# Altium PCB NB2DSK01.PcbDoc (part 12 of 17)
Units mil, origin at the board's own origin, x right, y up, seen from the top; angles counter-clockwise.
Board outline 11815 x 6500.03 mil, 8 copper layers (Top Layer, MidLayer1, MidLayer2, GND, PWR, MidLayer3, MidLayer4, Bottom Layer), stack 74.62 mil thick; 798 components, 1002 nets, 3927 pads, 3182 vias.
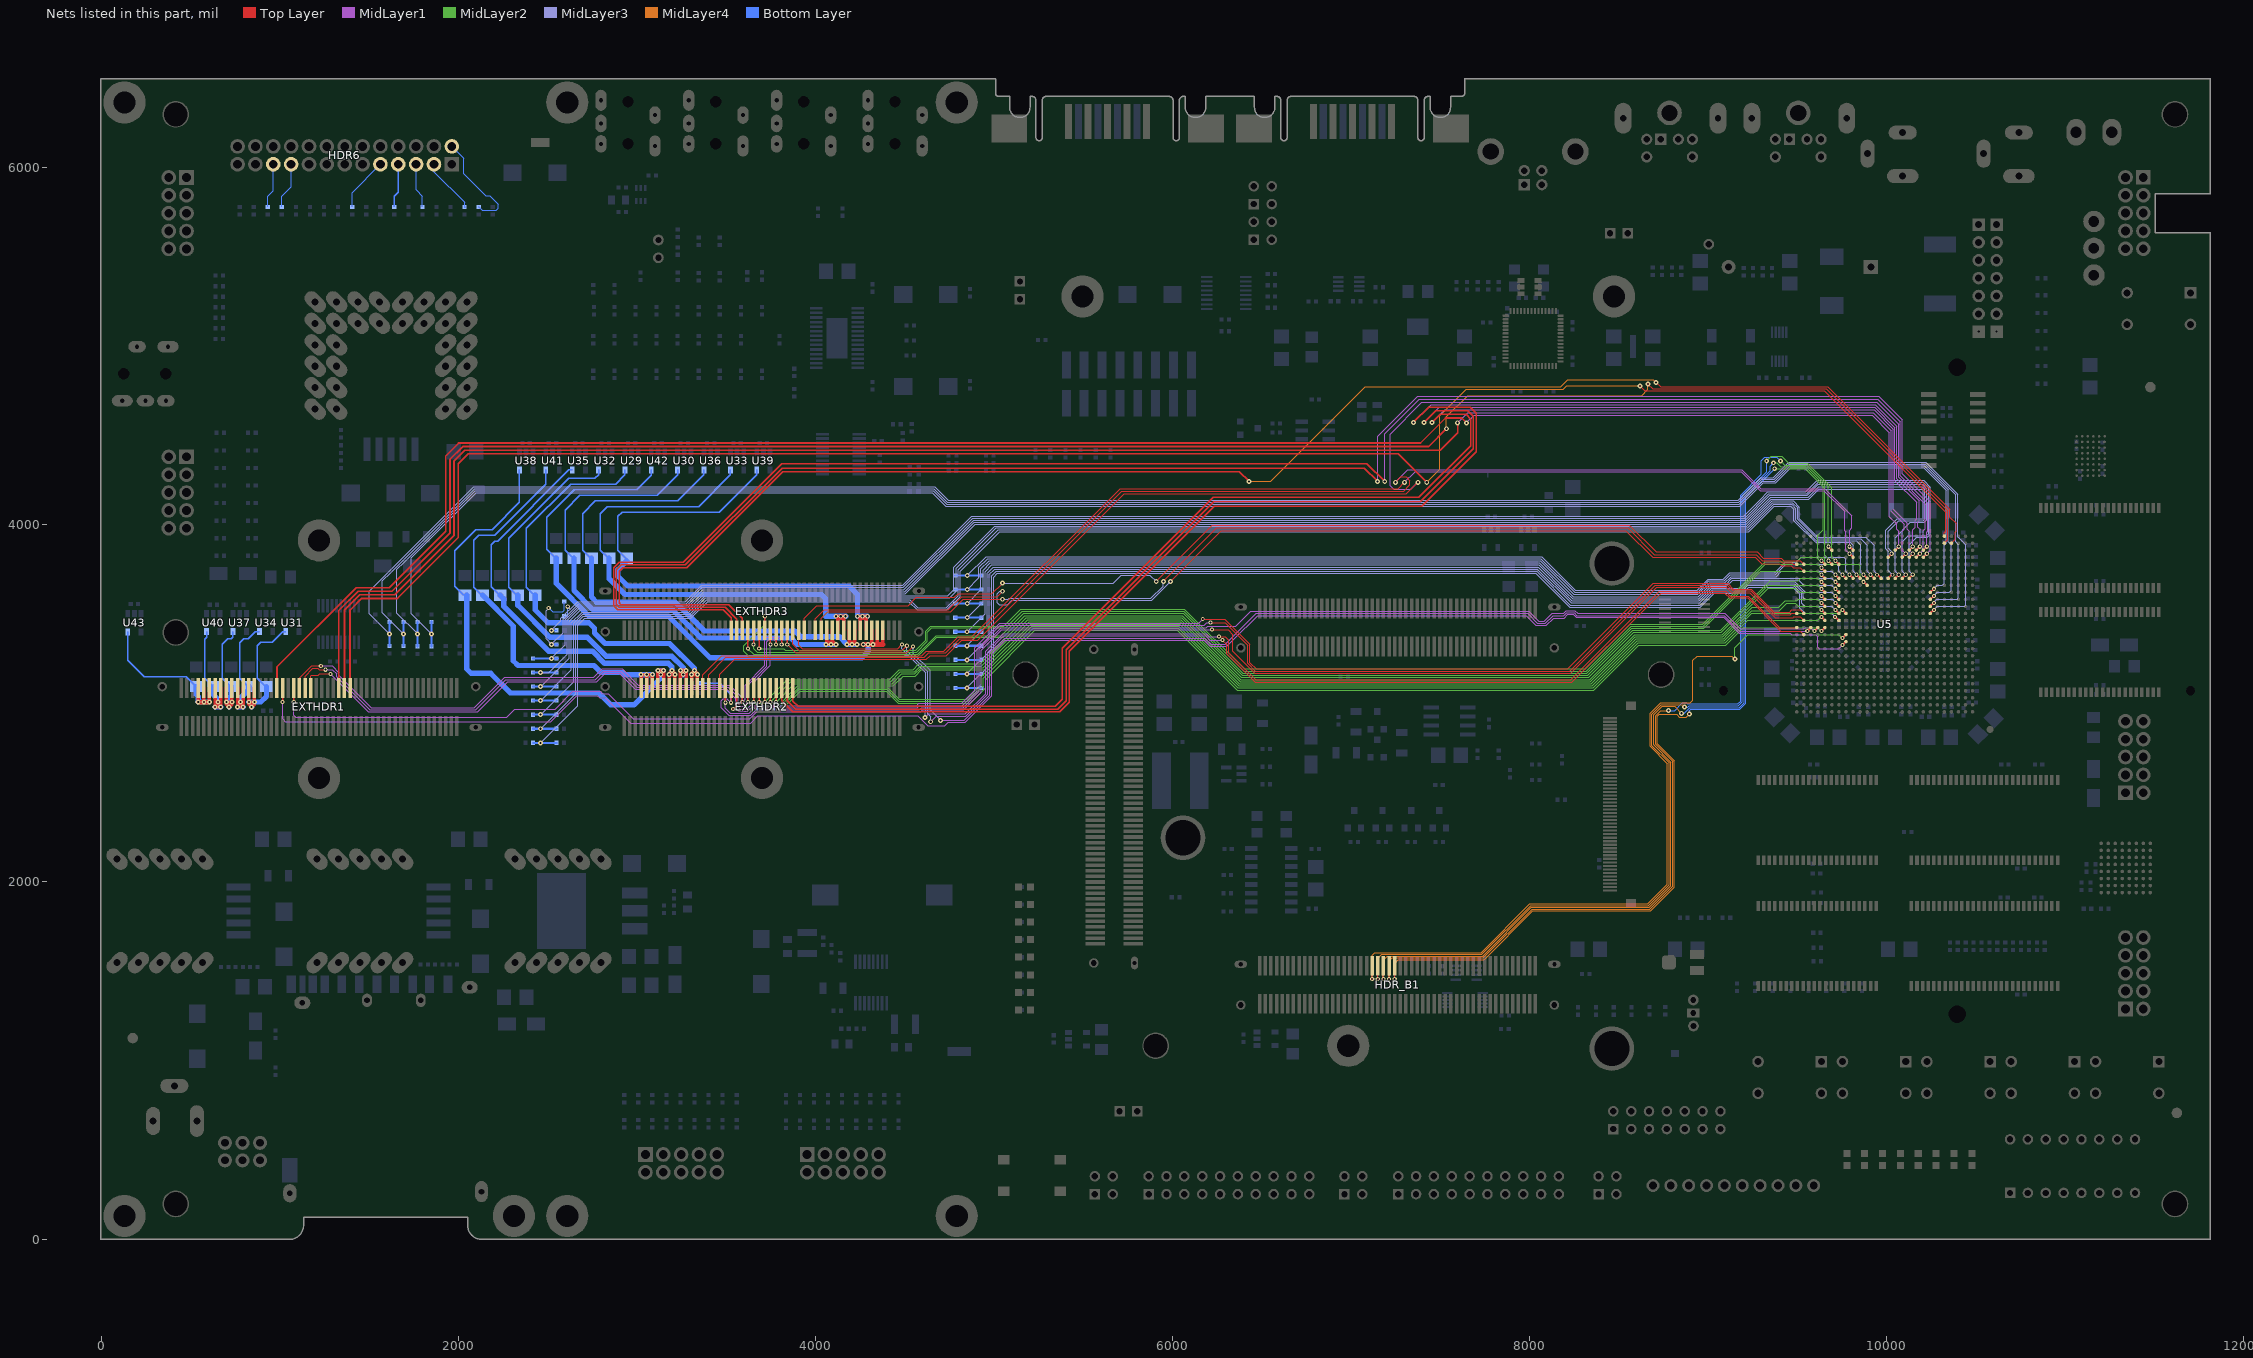
[diagram p18: the nets of this part, all layers, seen from the top]

## Via types
v1: diameter 23.62, hole 11.81, Top Layer to Bottom Layer, tented both sides, 1950 vias
v2: diameter 27.56, hole 11.81, Top Layer to Bottom Layer, tented both sides, 679 vias
v3: diameter 23.62, hole 11.81, Top Layer to Bottom Layer, 194 vias
v4: diameter 31.5, hole 11.81, Top Layer to Bottom Layer, tented both sides, 178 vias
v5: diameter 21.65, hole 11.81, Top Layer to Bottom Layer, tented both sides, 67 vias
v6: diameter 23.62, hole 11.81, Top Layer to Bottom Layer, tented bottom, 53 vias
v7: diameter 26, hole 11.81, Top Layer to Bottom Layer, tented both sides, 21 vias
v8: diameter 26, hole 11.81, Top Layer to Bottom Layer, 13 vias
v9: diameter 28, hole 11.81, Top Layer to Bottom Layer, 8 vias
v10: diameter 25.59, hole 11.81, Top Layer to Bottom Layer, tented both sides, 7 vias
v11: diameter 39.37, hole 11.81, Top Layer to Bottom Layer, tented both sides, 5 vias
v12: diameter 30, hole 11.81, Top Layer to Bottom Layer, 3 vias
v13: diameter 30, hole 11.81, Top Layer to Bottom Layer, tented both sides, 2 vias
v14: diameter 23, hole 11.81, Top Layer to Bottom Layer, tented both sides, 1 vias
v15: diameter 26.56, hole 11.81, Top Layer to Bottom Layer, tented both sides, 1 vias

## Nets (pads, with @x,y where several pads share a name; then routed paths per layer and width w, separated by ;. In a path a pad name is that pad's centre, name@x,y a point inside that pad or via, vN(x,y) a via of type N, cw(c..) or ccw(c..) an arc to the next point about the centre after c; other vN are vias at no path point) (continued)
PBCTRLA.JTAG.SOFT.TCK: R201.1 R205.1 U5.L20 | length 10456.2
  Top Layer w7.87: U5.L20@10244.09,3543.31 v1(10263.78,3562.99)
  MidLayer3 w5: v2(1692.91,3389.76) 1574.82,3507.86 1574.82,3685.85 1623.92,3734.95 2091.11,4202.14 4664,4202.14 4738.81,4127.34 9171.52,4127.34 9298.99,4254.8 9369.48,4254.8 9455.14,4340.45 10214.26,4340.45 10387,4167.72 10387,3904.34 10401.57,3889.76 10401.57,3590.55 10393.7,3582.68 10279.53,3582.68 v1(10263.78,3562.99)
  Bottom Layer w11.81: R205.1@1692.91,3322.36 R201.1@1692.91,3455.2
PBCTRLA.JTAG.SOFT.TDI: R198.1 R202.1 U5.J20 | length 10156.7
  Top Layer w7.87: U5.J20@10244.09,3622.05 v1(10264.57,3641.73)
  MidLayer3 w5: v2(1850.39,3387.8) 1736.75,3501.44 1736.75,3816.29 2100.33,4179.87 4654.78,4179.87 4729.58,4105.06 9177.53,4105.06 9307.27,4234.8 9377.77,4234.8 9463.42,4320.45 10205.98,4320.45 10333,4193.43 10333,3895.99 10322.83,3885.83 10322.83,3673.23 10311.02,3661.42 10283.47,3661.42 v1(10264.57,3641.73)
  Bottom Layer w11.81: R202.1@1850.39,3320.39 R198.1@1850.39,3455.2 R198.1@1850.39,3457.48
PBCTRLA.JTAG.SOFT.TDO: R199.1 R203.1 U5.K20 | length 10299.5
  Top Layer w7.87: U5.K20@10244.09,3582.68 v1(10264.57,3602.36)
  MidLayer3 w5: v2(1771.65,3389.76) 1655.59,3505.83 1655.59,3750.87 1699.07,3794.35 2095.72,4191 4659.39,4191 4734.19,4116.2 9174.53,4116.2 9303.13,4244.8 9373.63,4244.8 9459.28,4330.45 10210.12,4330.45 10343,4197.57 10343,3905.03 10362.2,3885.83 10362.2,3633.86 10350.39,3622.05 10283.47,3622.05 v1(10264.57,3602.36)
  Bottom Layer w11.81: R203.1@1771.65,3320.39 R199.1@1771.65,3455.2
PBCTRLA.JTAG.SOFT.TMS: R200.1 R204.1 U5.M20 | length 10602.6
  Top Layer w7.87: U5.M20@10244.09,3503.94 v1(10263.78,3523.62)
  MidLayer3 w5: v2(1614.17,3389.76) 1502.32,3501.62 1502.32,3628.06 1566.5,3692.24 2087.54,4213.27 4668.62,4213.27 4743.42,4138.47 9168.52,4138.47 9294.84,4264.8 9365.34,4264.8 9451,4350.45 10218.4,4350.45 10397,4171.86 10397,3933.71 10440.95,3889.76 10440.95,3551.18 10433.07,3543.31 10283.47,3543.31 v1(10263.78,3523.62)
  Bottom Layer w11.81: R204.1@1614.17,3322.36 R200.1@1614.17,3455.2
PBCTRLA.SPARE1: EXTHDR1.39 U5.A22 | length 10874.3
  Top Layer w5: v2(8617.38,4778.45) 8643.55,4752.28 9649.85,4752.28 9706.17,4695.97 10330.71,4071.43 10330.71,3964.57 10322.84,3956.69 U5.A22@10322.83,3937.01
  Top Layer w10: EXTHDR1.39@1393.7,3086.61 1393.7,3523.47 1458.68,3588.45 1659.32,3588.45 2000,3929.13 2000,4342.52 2055.93,4398.45 7263.68,4398.45 v2(7423.68,4238.45)
  MidLayer4 w5: v2(7423.68,4238.45) 7496.06,4310.84 7496.06,4610.24 7644.28,4758.45 8188.68,4758.45 8208.68,4778.45 v2(8617.38,4778.45)
PBCTRLA.SPARE2: EXTHDR1.41 U5.D16 | length 10635
  Top Layer w7.87: U5.D16@10086.61,3818.9 v1(10106.3,3838.58)
  Top Layer w10: EXTHDR1.41@1362.2,3086.61 1362.2,3521.98 1448.68,3608.45 1643.89,3608.45 1976.38,3940.94 1976.38,4358.27 2036.56,4418.45 7498.68,4418.45 7596.97,4516.74 v2(7596.97,4571.74)
  MidLayer1 w5: v2(7596.97,4571.74) 7653.68,4628.45 9923.68,4628.45 10025.33,4526.81 10025.33,4076.81 10098.43,4003.71 10098.43,3976.38 10086.62,3964.57 10086.62,3858.27 v1(10106.3,3838.58)
PBCTRLA.SPARE3: EXTHDR1.43 U5.B22 | length 10753.1
  Top Layer w5: v2(8662.38,4788.45) 8688.55,4762.28 9659.85,4762.28 9713.54,4708.59 10342.52,4079.61 10342.52,3917.32 U5.B22@10322.83,3897.64
  Top Layer w10: EXTHDR1.43@1330.71,3086.61 1330.71,3520.48 1438.68,3628.45 1628.45,3628.45 1952.76,3952.76 1952.76,4366.14 2025.07,4438.45 7433.68,4438.45 v2(7533.68,4538.45)
  MidLayer4 w5: v2(7533.68,4538.45) 7533.68,4604.55 7652.59,4723.45 8627.38,4723.45 8662.38,4758.45 v2(8662.38,4788.45)
PBCTRLA.SPARE4: EXTHDR1.65 U5.C15 | length 10729.9
  Top Layer w7.87: U5.C15@10047.24,3858.27 v1(10066.93,3877.95)
  Top Layer w10: EXTHDR1.65@984.25,3086.61 984.25,3204.02 1428.68,3648.45 1613.02,3648.45 1929.13,3964.57 1929.13,4385.83 2001.76,4458.45 7388.68,4458.45 7528.68,4598.45 7618.78,4598.45 v2(7646.23,4571)
  MidLayer1 w5: v2(7646.23,4571) 7688.68,4613.45 9918.68,4613.45 10015.27,4516.86 10015.27,4046.86 10055.12,4007.02 10055.12,3976.38 10066.93,3964.57 v1(10066.93,3877.95)
PBCTRLA.SPI_CS_N0: EXTHDR1.59 U5.N2 | length 9521.4
  Top Layer w5: v5(6220.47,3413.39) 6311.02,3413.39 6338.58,3385.83 6338.58,3291.34 6460.63,3169.29 8230.52,3169.29 8712.68,3651.45 9102.25,3651.45 9132.92,3620.79 9233.93,3620.79 9374.4,3480.32 9413.39,3480.32 9433.07,3480.32 9476.38,3480.32 9480.32,3484.25 9515.75,3484.25 U5.N2@9535.43,3464.57
  Top Layer w7.87: v1(1078.74,3007.87) EXTHDR1.59@1078.74,3086.61
  MidLayer1 w5: v1(1078.74,3007.87) 1078.74,2933.07 1090.55,2921.26 2270.37,2921.26 2315.54,2966.43 2541.65,2966.43 2642.16,3066.93 2795.28,3066.93 2807.09,3055.12 2838.58,3055.12 2980.32,2913.39 3632.25,2913.39 3671.62,2952.76 4590.55,2952.76 4602.36,2964.57 4830.71,2964.57 4929.13,3062.99 4929.13,3299.21 5043.31,3413.39 v5(6220.47,3413.39)
PBCTRLA.SPI_CS_N1: EXTHDR1.63 U5.T8 | length 9702.4
  Top Layer w7.87: v1(1015.75,3007.87) EXTHDR1.63@1015.75,3086.61 ; v1(9751.97,3326.77) U5.T8@9771.65,3346.46
  MidLayer1 w5: v1(1015.75,3007.87) 1015.75,2913.39 1031.5,2897.64 2516.59,2897.64 2662.26,3043.31 2779.53,3043.31 2791.34,3031.5 2822.83,3031.5 2964.57,2889.76 3636.91,2889.76 3678.1,2930.95 4572.99,2930.95 4629.92,2874.02 4724.41,2874.02 4744.09,2893.7 4838.58,2893.7 4988.19,3043.31 4988.19,3279.53 5062.99,3354.33 6177.17,3354.33 6212.6,3318.9 6303.15,3318.9 6342.52,3358.27 6476.39,3492.13 7980.31,3492.13 8035.43,3437.01 8092.46,3437.01 8133.91,3478.45 8193.68,3478.45 8213.68,3498.45 8243.68,3498.45 8260.01,3482.13 9085.68,3482.13 9174.11,3393.7 9413.39,3393.7 9433.07,3393.7 9460.63,3393.7 9468.5,3385.83 9602.36,3385.83 9614.17,3374.02 9614.17,3314.96 9622.05,3307.09 9732.28,3307.09 v1(9751.97,3326.77)
PBCTRLB.1W.ID: EXTHDR2.61 R143.1 U5.P4 | length 7088.1
  Top Layer w7.87: v1(3527.56,3004.42) EXTHDR2.61@3527.56,3086.61 ; v1(9594.49,3405.51) U5.P4@9614.17,3425.2
  MidLayer1 w5: v1(3527.56,3004.42) 3504.42,3027.56 3484.25,3027.56 3472.44,3015.75 3472.44,2976.38 3515.75,2933.07 3637.8,2933.07 3669.29,2964.57 4582.68,2964.57 4594.49,2976.38 4826.77,2976.38 4917.32,3066.93 4917.32,3303.15 5039.37,3425.2 6188.98,3425.2 6196.85,3433.07 6354.33,3433.07 6437.01,3515.75 7996.06,3515.75 8051.18,3460.63 8082.68,3460.63 8125.98,3503.94 8190.02,3503.94 8204.54,3518.45 8253.68,3518.45 8268.2,3503.94 9092.16,3503.94 9178.77,3417.32 9413.39,3417.32 9433.07,3417.32 9535.43,3417.32 9543.31,3425.2 9574.8,3425.2 v1(9594.49,3405.51)
  Bottom Layer w10: R143.1@3349.86,3113.45 3463.68,3113.45 3527.56,3049.58 v1(3527.56,3004.42)
PBCTRLB.1W.PIO1: EXTHDR2.69 U5.C9 | length 7463.6
  Top Layer w5: EXTHDR2.69@3401.57,3086.61 3401.57,3161.35 3498.68,3258.45 4608.68,3258.45 4633.68,3283.45 4728.68,3283.45 4808.68,3363.45 4890.68,3363.45 5715.68,4188.45 7293.68,4188.45 7328.68,4223.45 7328.68,4248.45 7308.68,4268.45 7278.68,4268.45 v2(7248.68,4238.45)
  Top Layer w7.87: v1(9791.34,3877.95) U5.C9@9811.02,3858.27
  MidLayer1 w5: v2(7248.68,4238.45) 7318.68,4308.45 9188.68,4308.45 9295.14,4202 9651.85,4202 9803.68,4050.17 9803.68,3983.45 9791.34,3971.11 v1(9791.34,3877.95)
PBCTRLB.1W.PIO2: EXTHDR2.71 U5.D9 | length 7308.5
  Top Layer w5: EXTHDR2.71@3370.08,3086.61 3370.08,3161.85 3476.68,3268.45 4596.68,3268.45 4621.68,3293.45 4718.68,3293.45 4798.68,3373.45 4876.68,3373.45 5706.68,4203.45 7263.68,4203.45 v2(7298.68,4238.45)
  Top Layer w7.87: v1(9791.34,3838.58) U5.D9@9811.02,3818.9
  MidLayer1 w5: v2(7298.68,4238.45) 7358.68,4298.45 9184.05,4298.45 9290.51,4192 9647.71,4192 9763.68,4076.03 9763.68,3968.45 9771.65,3960.48 9771.65,3858.27 v1(9791.34,3838.58)
PBCTRLB.CLK.CLK0: EXTHDR2.51 U5.M5 | length 6593.4
  Top Layer w7.87: v1(3685.04,3007.87) EXTHDR2.51@3685.04,3086.61 ; v1(9633.86,3523.62) U5.M5@9653.54,3503.94
  MidLayer2 w5: v1(3685.04,3007.87) 3704.72,2988.19 3791.34,2988.19 3901.58,3098.43 4437.01,3098.43 4492.13,3153.54 4559.78,3153.54 4594.09,3187.85 4947.7,3187.85 5204.72,3444.88 6039.37,3444.88 6374.02,3110.24 8345.27,3110.24 8597.24,3362.21 9086.61,3362.21 9108,3383.59 9244.86,3520.45 9398.41,3520.45 9438.86,3560.91 9486.34,3560.91 9503.94,3543.31 9614.17,3543.31 v1(9633.86,3523.62)
PBCTRLB.CLK.CLK1: EXTHDR2.45 U5.L5 | length 6484.4
  Top Layer w7.87: v1(3779.53,3007.87) EXTHDR2.45@3779.53,3086.61 ; v1(9633.86,3562.99) U5.L5@9653.54,3543.31
  MidLayer2 w5: v1(3779.53,3007.87) 3881.89,3110.24 4429.13,3110.24 4484.25,3165.36 4557.45,3165.36 4591.55,3199.45 4939.61,3199.45 5196.85,3456.69 6043.31,3456.69 6377.95,3122.05 8340.38,3122.05 8592.35,3374.02 9082.68,3374.02 9246.12,3537.45 9394.68,3537.45 9431.68,3574.45 9495.71,3574.45 9503.94,3582.68 9614.17,3582.68 v1(9633.86,3562.99)
PBCTRLB.CLK.CLK2: EXTHDR2.47 U5.K5 | length 6553.4
  Top Layer w7.87: v1(3748.03,3007.87) EXTHDR2.47@3748.03,3086.61 ; v1(9633.86,3602.36) U5.K5@9653.54,3582.68
  MidLayer2 w5: v1@3745.7,3007.87 v1@3746.87,3009.04 ; v1(3748.03,3007.87) 3862.21,3122.05 4421.26,3122.05 4476.38,3177.17 4555.12,3177.17 4587.41,3209.45 4929.93,3209.45 5188.98,3468.5 6047.24,3468.5 6381.89,3133.86 8335.49,3133.86 8587.45,3385.83 9077.78,3385.83 9337.63,3645.67 9417.32,3645.67 9433.07,3645.67 9488.19,3645.67 9511.81,3622.05 9614.17,3622.05 v1(9633.86,3602.36)
PBCTRLB.CLK.EN: EXTHDR2.49 U5.J5 | length 6580
  Top Layer w7.87: v1(3716.54,3007.87) EXTHDR2.49@3716.54,3086.61 ; v1(9633.86,3641.73) U5.J5@9653.54,3622.05
  MidLayer2 w5: v1(3716.54,3007.87) 3842.52,3133.86 4413.39,3133.86 4468.5,3188.98 4547.24,3188.98 4579.72,3221.45 4922.24,3221.45 5181.1,3480.32 6051.18,3480.32 6385.83,3145.67 8330.59,3145.67 8582.56,3397.64 9072.89,3397.64 9336.67,3661.42 9417.32,3661.42 9433.07,3661.42 9614.17,3661.42 v1(9633.86,3641.73)
PBCTRLB.JTAG.DETECT: R224.1 R225.1 U5.G9 | length 5394.3
  Top Layer w7.87: v1(9791.34,3720.47) U5.G9@9811.02,3700.79
  MidLayer3 w5: v2(4850.39,3716.54) 4956.69,3822.84 8066.93,3822.84 8255.91,3633.86 8938,3633.86 8999.99,3695.85 9084.86,3695.85 9119.8,3730.79 9372.34,3730.79 9431.08,3789.53 9490.32,3789.53 9519.69,3818.9 9759.84,3818.9 9771.65,3807.09 9771.65,3740.16 v1(9791.34,3720.47)
  Bottom Layer w11.81: R225.1@4782.99,3716.54 R224.1@4929.61,3716.54
PBCTRLB.JTAG.HARD.TCK: R211.1 R215.1 U5.L7 | length 5637.9
  Top Layer w7.87: v1(9712.6,3562.99) U5.L7@9732.28,3543.31
  MidLayer3 w5: v2(4848.43,3244.1) 4974.41,3370.08 4974.41,3722.44 5003.94,3751.97 8043.31,3751.97 8232.28,3562.99 8951.99,3562.99 9024.85,3635.85 9181.18,3635.85 9216.12,3670.79 9481.77,3670.79 9532.83,3619.73 9532.83,3593.16 9543.31,3582.68 9696.85,3582.68 v1(9712.6,3562.99)
  Bottom Layer w11.81: R215.1@4784.96,3244.1 R211.1@4929.61,3244.1
PBCTRLB.JTAG.HARD.TDI: R208.1 R212.1 U5.M7 | length 5727.6
  Top Layer w7.87: v1(9712.6,3523.62) U5.M7@9732.28,3503.94
  MidLayer3 w5: v2(4848.43,3165.36) 4986.22,3303.15 4986.22,3714.57 5011.81,3740.16 8039.37,3740.16 8228.35,3551.18 8954.32,3551.18 9028.99,3625.85 9187.89,3625.85 9222.83,3660.79 9477.63,3660.79 9522.83,3615.58 9522.83,3561.98 9541.5,3543.31 9692.91,3543.31 v1(9712.6,3523.62)
  Bottom Layer w11.81: R212.1@4784.96,3165.35 R208.1@4929.61,3165.35
PBCTRLB.JTAG.HARD.TDO: R209.1 R213.1 U5.N7 | length 5816.6
  Top Layer w7.87: v5@9709.84,3485.83 9710.84,3484.89 U5.N7@9732.28,3464.57
  MidLayer3 w5: v2(4848.43,3086.61) 4998.03,3236.22 4998.03,3706.69 5019.69,3728.35 8035.43,3728.35 8224.41,3539.37 8956.65,3539.37 9033.13,3615.85 9192.03,3615.85 9226.97,3650.79 9473.48,3650.79 9512.83,3611.44 9512.83,3534.41 9543.3,3503.94 9558.84,3503.94 9692.91,3503.94 v5@9709.84,3485.83
  Bottom Layer w11.81: R213.1@4784.96,3086.61 R209.1@4929.61,3086.61
  other v5: 9710.24,3484.25
PBCTRLB.JTAG.HARD.TMS: R210.1 R214.1 U5.K7 | length 5545.8
  Top Layer w7.87: v1(9712.6,3602.36) U5.K7@9732.28,3582.68
  MidLayer3 w5: v2(4848.43,3322.84) 4962.6,3437.01 4962.6,3730.32 4996.06,3763.78 8047.24,3763.78 8236.22,3574.8 8949.66,3574.8 9020.7,3645.85 9174.48,3645.85 9209.42,3680.79 9485.91,3680.79 9544.65,3622.05 9692.91,3622.05 v1(9712.6,3602.36)
  Bottom Layer w11.81: R214.1@4784.96,3322.84 R210.1@4929.61,3322.84
PBCTRLB.JTAG.SOFT.TCK: R219.1 R223.1 U5.G7 | length 5345.6
  Top Layer w7.87: v1(9712.6,3720.47) U5.G7@9732.28,3700.79
  MidLayer3 w5: v2(4850.39,3559.06) 4927.17,3635.83 4927.17,3753.94 4972.44,3799.21 8059.06,3799.21 8219.18,3639.09 8248.03,3610.24 8942.66,3610.24 9008.28,3675.85 9093.78,3675.85 9128.72,3710.79 9380.63,3710.79 9410,3740.16 9692.91,3740.16 v1(9712.6,3720.47)
  Bottom Layer w11.81: R223.1@4782.99,3559.06 R219.1@4929.61,3559.06
PBCTRLB.JTAG.SOFT.TDI: R216.1 R220.1 U5.J7 | length 5471.7
  Top Layer w7.87: v1(9712.6,3641.73) U5.J7@9732.28,3622.05
  MidLayer3 w5: v2@4850.39,3401.58 4950.79,3501.97 4950.79,3738.19 4988.19,3775.59 8051.18,3775.59 8206.07,3620.7 8240.16,3586.61 8947.32,3586.61 9016.56,3655.85 9102.06,3655.85 9137,3690.79 9506.07,3690.79 9535.43,3661.42 9692.91,3661.42 v1(9712.6,3641.73)
  Bottom Layer w11.81: R220.1@4782.99,3401.58 R216.1@4929.61,3401.58
  other v2: 4848.43,3401.58
PBCTRLB.JTAG.SOFT.TDO: R217.1 R221.1 U5.H7 | length 5396.5
  Top Layer w7.87: v1(9712.6,3681.1) U5.H7@9732.28,3661.42
  MidLayer3 w5: v2(4850.39,3480.32) 4938.98,3568.9 4938.98,3746.06 4980.32,3787.4 8055.12,3787.4 8244.09,3598.43 8944.99,3598.43 9012.42,3665.85 9097.92,3665.85 9132.86,3700.79 9433.07,3700.79 9692.91,3700.79 v1(9712.6,3681.1)
  Bottom Layer w11.81: R221.1@4782.99,3480.32 R217.1@4929.61,3480.32
PBCTRLB.JTAG.SOFT.TMS: R218.1 R222.1 U5.G8 | length 5366.5
  Top Layer w7.87: v1(9751.97,3720.47) U5.G8@9771.65,3700.79
  MidLayer3 w5: v2(4850.39,3637.8) 4915.35,3702.76 4915.35,3761.81 4964.57,3811.02 8062.99,3811.02 8251.97,3622.05 8940.33,3622.05 9004.13,3685.85 9089,3685.85 9123.94,3720.79 9376.49,3720.79 9435.23,3779.53 9720.47,3779.53 9732.28,3767.72 9732.28,3740.16 v1(9751.97,3720.47)
  Bottom Layer w11.81: R222.1@4782.99,3637.8 R218.1@4929.61,3637.8
PBCTRLB.SPARE1: EXTHDR2.39 U5.D17 | length 8472.6
  Top Layer w7.87: U5.D17@10125.98,3818.9 v1(10145.67,3838.58)
  Top Layer w8: EXTHDR2.39@3874.02,3086.61 3874.02,3013.12 3903.68,2983.45 5342.68,2983.45 5383.68,3024.45 5383.68,3308.45 6228.68,4153.45 7378.68,4153.45 7669.29,4444.06 7669.29,4592.84 7643.68,4618.45 7498.68,4618.45 v2(7453.68,4573.45)
  MidLayer1 w5: v2(7453.68,4573.45) 7523.68,4643.45 9928.68,4643.45 10035.74,4536.39 10035.74,4086.39 10114.17,4007.96 10114.17,3976.38 10125.99,3964.57 10125.99,3858.27 v1(10145.67,3838.58)
PBCTRLB.SPARE2: EXTHDR2.41 U5.C17 | length 8674.6
  Top Layer w7.87: U5.C17@10125.98,3858.27 v1(10145.67,3877.95)
  Top Layer w8: EXTHDR2.41@3842.52,3086.61 3842.52,3014.61 3888.68,2968.45 5356.68,2968.45 5403.68,3015.45 5403.68,3300.45 6231.68,4128.45 7386.68,4128.45 7685.04,4426.81 7685.04,4607.1 7653.68,4638.45 7473.68,4638.45 v2(7408.68,4573.45)
  MidLayer1 w5: v2(7408.68,4573.45) 7493.68,4658.45 9931.68,4658.45 10045.74,4544.39 10045.74,4247.39 10167.68,4125.45 10167.68,4033.45 10159.68,4025.45 10159.68,3986.45 10145.67,3972.44 v1(10145.67,3877.95)
PBCTRLB.SPARE3: EXTHDR2.43 U5.C18 | length 8936.3
  Top Layer w7.87: U5.C18@10165.35,3858.27 v1(10185.04,3877.95)
  Top Layer w8: EXTHDR2.43@3811.02,3086.61 3811.02,3016.11 3873.68,2953.45 5369.68,2953.45 5421.68,3005.45 5421.68,3291.45 6233.68,4103.45 7395.68,4103.45 7700.79,4408.56 7700.79,4626.35 7668.68,4658.45 7433.68,4658.45 v2(7348.68,4573.45)
  MidLayer1 w5: v2(7348.68,4573.45) 7447.68,4672.45 9936.68,4672.45 10055.74,4553.39 10055.74,4259.39 10180.68,4134.45 10180.68,4022.45 10174.68,4016.45 10174.68,3987.45 10187.68,3974.45 10187.68,3880.6 v1(10185.04,3877.95)
PBCTRLB.SPARE4: EXTHDR2.65 U5.D18 | length 8699.6
  Top Layer w5: EXTHDR2.65@3464.57,3086.61 3464.57,3162.34 3548.68,3246.45 4621.68,3246.45 4643.68,3268.45 4733.68,3268.45 4818.68,3353.45 4908.68,3353.45 5728.68,4173.45 7308.68,4173.45 v2(7373.68,4238.45)
  Top Layer w7.87: U5.D18@10165.35,3818.9 v1(10185.04,3838.58)
  MidLayer1 w5: v2(7373.68,4238.45) 7333.68,4198.45 7238.68,4198.45 7218.68,4218.45 7218.68,4508.45 7396.68,4686.45 9942.68,4686.45 10065.74,4563.39 10065.74,4265.39 10215.68,4115.45 10215.68,3977.45 10204.68,3966.45 10204.68,3858.23 v1(10185.04,3838.58)
PBCTRLB.SPI_CS_N0: EXTHDR2.59 U5.M2 | length 6934
  Top Layer w5: v5(6169.29,3472.44) 6291.34,3472.44 6433.07,3330.71 6433.07,3228.35 6468.5,3192.91 8212.48,3192.91 8693.02,3673.45 9108.53,3673.45 9141.2,3640.79 9242.21,3640.79 9371.19,3511.81 9456.69,3511.81 9468.5,3523.62 9515.75,3523.62 U5.M2@9535.43,3503.94
  Top Layer w7.87: v1(3539.37,2968.5) 3559.06,2988.19 EXTHDR2.59@3559.06,3086.61
  MidLayer1 w5: v1(3539.37,2968.5) 3559.06,2968.5 3570.87,2956.69 3622.05,2956.69 3653.54,2988.19 4566.93,2988.19 4578.74,3000 4818.9,3000 4893.7,3074.8 4893.7,3311.02 5031.5,3448.82 6145.67,3448.82 v5(6169.29,3472.44)
PBCTRLB.SPI_CS_N1: EXTHDR2.63 U5.M1 | length 6918.4
  Top Layer w5: v5(6212.6,3452.76) 6295.28,3452.76 6421.26,3326.77 6421.26,3224.41 6464.57,3181.1 8223.33,3181.1 8704.68,3662.45 9105.39,3662.45 9137.06,3630.79 9238.07,3630.79 9372.79,3496.06 9413.39,3496.06 9433.07,3496.06 9460.63,3496.06 9468.5,3503.94 U5.M1@9496.06,3503.94
  Top Layer w7.87: v1(3496.06,3004.42) EXTHDR2.63@3496.06,3086.61
  MidLayer1 w5: v1(3496.06,3004.42) 3496.06,2972.44 3523.62,2944.88 3629.92,2944.88 3661.42,2976.38 4570.87,2976.38 4582.68,2988.19 4822.83,2988.19 4905.51,3070.87 4905.51,3307.09 5035.43,3437.01 6177.17,3437.01 6192.91,3452.76 v5(6212.6,3452.76)
PBCTRLC.1W.ID: EXTHDR3.61 R144.1 U5.R2 | length 6959.3
  Top Layer w5: EXTHDR3.61@3874.02,3388.45 3874.02,3330.71 ; 3896.43,3308.29 3874.02,3330.71 ; v1(4511.81,3322.84) 4484.25,3295.28 3909.45,3295.28 3874.02,3330.71 ; v5(6279.53,3354.33) 6303.15,3330.71 6303.15,3279.53 6463.22,3119.45 8236.68,3119.45 8716.67,3599.44 8735.68,3618.45 9092.82,3618.45 9120.49,3590.79 9221.5,3590.79 9406.78,3405.51 9515.75,3405.51 U5.R2@9535.43,3385.83
  MidLayer1 w5: v2(4645.67,2897.64) 4677.17,2929.13 4842.52,2929.13 4964.57,3051.18 4964.57,3287.4 5055.12,3377.95 6185.04,3377.95 6208.66,3354.33 v5(6279.53,3354.33)
  MidLayer3 w5: v1(4511.81,3322.84) 4511.81,3295.28 4629.92,3177.17 4629.92,2940.95 4645.67,2925.2 v2(4645.67,2897.64)
  Bottom Layer w5: R144.1@4511.81,3264.66 v1(4511.81,3322.84)
PBCTRLC.1W.PIO1: EXTHDR3.69 U5.F2 | length 6051.2
  Top Layer w5: EXTHDR3.69@4000,3409.45 4000,3474.77 4048.68,3523.45 4743.68,3523.45 4818.68,3598.45 5018.68,3598.45 v2(5048.68,3628.45) ; v2(5988.68,3683.45) 6273.68,3968.45 8538.68,3968.45 8688.68,3818.45 9263.68,3818.45 9298.68,3783.45 9398.68,3783.45 9410.48,3771.65 9464.57,3771.65 9476.38,3759.84 9515.75,3759.84 U5.F2@9535.43,3740.16
  MidLayer3 w5: v2(5048.68,3628.45) 5033.68,3628.45 5018.68,3613.45 5018.68,3563.45 5028.68,3553.45 5076,3553.45 5100.55,3578 5883.23,3578 v2(5988.68,3683.45)
PBCTRLC.1W.PIO2: EXTHDR3.71 U5.E1 | length 5841.1
  Top Layer w5: EXTHDR3.71@4031.5,3409.45 4031.5,3476.27 4068.68,3513.45 4758.68,3513.45 4828.68,3583.45 v2(5048.68,3583.45) ; v2(5948.68,3683.45) 6248.68,3983.45 8548.68,3983.45 8698.68,3833.45 9268.68,3833.45 9303.68,3798.45 9403.68,3798.45 9414.73,3787.4 9468.5,3787.4 9476.38,3779.53 U5.E1@9496.06,3779.53
  MidLayer3 w5: v2(5048.68,3583.45) 5080.45,3583.45 5085,3588 5879.09,3588 5948.68,3657.6 v2(5948.68,3683.45)
PBCTRLC.CLK.CLK0: EXTHDR3.51 U5.H5 | length 6865.6
  Top Layer w7.87: EXTHDR3.51@3716.54,3409.45 v1(3716.54,3488.19) ; v1(9633.86,3681.1) U5.H5@9653.54,3661.42
  MidLayer2 w5: v1(3716.54,3488.19) 3716.54,3440.95 3598.43,3322.84 3598.43,3291.34 3625.98,3263.78 4574.2,3263.78 4680.42,3370 5051.1,3370 5173.23,3492.13 6055.12,3492.13 6389.76,3157.48 8325.7,3157.48 8577.67,3409.45 9070.56,3409.45 9347.57,3686.45 9503.05,3686.45 9517.39,3700.79 9614.17,3700.79 v1(9633.86,3681.1)
PBCTRLC.CLK.CLK1: EXTHDR3.45 U5.G5 | length 6632.9
  Top Layer w7.87: v1(3622.05,3307.09) EXTHDR3.45@3622.05,3409.45 ; v1(9633.86,3720.47) U5.G5@9653.54,3700.79
  MidLayer2 w5: v1(3622.05,3307.09) 3653.54,3275.59 4571.87,3275.59 4676.28,3380 5041.42,3380 5165.35,3503.94 6059.06,3503.94 6393.7,3169.29 8320.81,3169.29 8572.78,3421.26 8974.49,3421.26 9293.39,3740.16 9614.17,3740.16 v1(9633.86,3720.47)
PBCTRLC.CLK.CLK2: EXTHDR3.47 U5.F5 | length 6637.7
  Top Layer w7.87: v1(3653.54,3330.71) EXTHDR3.47@3653.54,3409.45 ; v1(9633.86,3759.84) U5.F5@9653.54,3740.16
  MidLayer2 w5: v1(3653.54,3330.71) 3653.54,3307.09 3673.23,3287.4 4566.63,3287.4 4627.68,3348.45 4627.68,3399.31 4651.37,3423 5064.73,3423 5157.48,3515.75 6062.99,3515.75 6397.64,3181.1 8315.92,3181.1 8567.88,3433.07 8972.16,3433.07 9318.61,3779.53 9417.32,3779.53 9433.07,3779.53 9614.17,3779.53 v1(9633.86,3759.84)
PBCTRLC.CLK.EN: EXTHDR3.49 U5.E5 | length 6612
  Top Layer w7.87: v1(3685.04,3307.09) EXTHDR3.49@3685.04,3409.45 ; v1(9633.86,3799.21) U5.E5@9653.54,3779.53
  MidLayer2 w5: v1(3685.04,3307.09) 3822.84,3307.09 3830.71,3299.21 4562.99,3299.21 4617.68,3353.9 4617.68,3403.45 4647.23,3433 5055.05,3433 5096.54,3474.49 5149.61,3527.56 6066.93,3527.56 6401.57,3192.91 8311.02,3192.91 8562.99,3444.88 8969.83,3444.88 9318.4,3793.45 9495.17,3793.45 9520.62,3818.9 9604,3818.9 9623.68,3799.21 v1(9633.86,3799.21)
PBCTRLC.JTAG.DETECT: R242.1 R243.1 U5.G10 | length 8748.3
  Top Layer w7.87: v1(9830.71,3720.47) U5.G10@9850.39,3700.79
  MidLayer3 w5: v2(2460.63,2779.53) 2669.29,2988.19 2669.29,3437.01 2708.66,3476.38 3303.15,3476.38 3397.32,3570.55 4523.74,3570.55 4570.67,3523.62 4736.22,3523.62 4811.02,3598.43 4811.02,3739.83 5031.5,3960.3 9226.26,3960.3 9370.76,4104.8 9462.7,4104.8 9480.3,4087.2 9480.3,4022.4 9601.12,3901.58 9795.28,3901.58 9811.02,3885.83 9811.02,3740.16 v1(9830.71,3720.47)
  Bottom Layer w11.81: R242.1@2418.43,2779.53 R243.1@2548.9,2779.53 R243.1@2552.76,2779.53
PBCTRLC.JTAG.HARD.TCK: R229.1 R233.1 U5.G15 | length 8973
  Top Layer w7.87: U5.G15@10047.24,3700.79 v1(10066.93,3720.47)
  MidLayer3 w5: v2(2521.65,3251.97) 2598.43,3328.74 2598.43,3468.5 2677.17,3547.24 3279.53,3547.24 3370.08,3637.8 4496.06,3637.8 4885.38,4027.12 9208.22,4027.12 9345.9,4164.8 9555.65,4164.8 9617.31,4226.45 10200.98,4226.45 10224,4203.44 10224,4029 10209,4014 10132,4014 10047.18,3929.18 10047.18,3740.22 v1(10066.93,3720.47)
  Bottom Layer w11.81: R229.1@2418.43,3251.97 R233.1@2550.87,3251.97 R233.1@2556.69,3251.97
PBCTRLC.JTAG.HARD.TDI: R226.1 R230.1 U5.G16 | length 9191.9
  Top Layer w7.87: U5.G16@10086.61,3700.79 v1(10106.3,3720.47)
  MidLayer3 w5: v1(2506,3535) 2491.26,3520.26 2491.26,3361.1 v2(2521.65,3330.71) 2586.61,3395.67 2586.61,3472.44 2673.23,3559.06 3275.59,3559.06 3366.14,3649.61 4492.13,3649.61 4880.77,4038.25 9203.61,4038.25 9340.15,4174.8 9551.51,4174.8 9615.16,4238.45 10203.12,4238.45 10234,4207.58 10234,3951.71 10221.86,3939.57 10120.67,3939.57 10086.61,3905.51 10086.61,3740.16 v1(10106.3,3720.47)
  Bottom Layer w5: v1(2506,3535) 2528.1,3512.9 2584.25,3512.9 2593.23,3521.89 R226.1@2593.23,3566.93
  Bottom Layer w11.81: v2(2521.65,3330.71) R230.1@2550.87,3330.71 R230.1@2555.91,3330.71
PBCTRLC.JTAG.HARD.TDO: R227.1 R231.1 U5.G17 | length 8825.4
  Top Layer w7.87: U5.G17@10125.98,3700.79 v1(10145.67,3721.26)
  MidLayer3 w5: v2(2521.65,3409.45) 2574.8,3462.6 2574.8,3476.38 2669.29,3570.87 3271.65,3570.87 3362.2,3661.42 4488.19,3661.42 4876.16,4049.39 9198.99,4049.39 9290.66,4141.06 9334.41,4184.8 9547.37,4184.8 9612.02,4249.45 10206.27,4249.45 10244,4211.72 10244,3947.57 10226,3929.57 10167.55,3929.57 10125.98,3888 10125.98,3740.16 v1(10145.67,3721.26) ; v1(2613,3542) 2626.67,3528.33
  Bottom Layer w5: v2(2521.65,3409.45) R231.1@2550.87,3409.45 ; R227.1@2593.23,3488.19 2611.19,3488.19 2613,3490 v1(2613,3542)
PBCTRLC.JTAG.HARD.TMS: R228.1 R232.1 U5.D14 | length 9008.6
  Top Layer w7.87: U5.D14@10007.87,3818.9 v1(10027.56,3838.58)
  MidLayer3 w5: v2@2450.79,3173.23 2507.87,3173.23 2610.24,3275.59 2610.24,3464.57 2681.1,3535.43 3283.46,3535.43 3374.02,3625.98 4500,3625.98 4889.76,4015.75 ; 4889.76,4015.98 9211.22,4015.98 9350.04,4154.8 9559.8,4154.8 9618.45,4213.45 10199.84,4213.45 10214,4199.29 10214,4033.14 10204.86,4024 10067.18,4024 10007.68,3964.5 10007.68,3869.27 10027.56,3849.39 v1(10027.56,3838.58)
  Bottom Layer w11.81: R228.1@2418.43,3173.23 R232.1@2550.87,3173.23 R232.1@2553.54,3173.23
  other v2: 2460.63,3173.23
PBCTRLC.JTAG.SOFT.TCK: R237.1 R241.1 U5.G12 | length 8657.4
  Top Layer w7.87: v1(9909.45,3720.47) U5.G12@9929.13,3700.79
  MidLayer3 w5: v2(2460.63,2937.01) 2645.67,3122.05 2645.67,3448.82 2696.85,3500 3295.28,3500 3385.83,3590.55 4751.97,3590.55 4789.21,3627.8 4789.21,3757.72 5014.07,3982.57 9220.24,3982.57 9362.47,4124.8 9470.98,4124.8 9500.3,4095.48 9500.3,4030.68 9609.41,3921.58 9854.01,3921.58 9889.76,3885.83 9889.76,3740.16 v1(9909.45,3720.47)
  Bottom Layer w11.81: R237.1@2418.43,2937.01 R241.1@2548.9,2937.01
PBCTRLC.JTAG.SOFT.TDI: R234.1 R238.1 U5.G14 | length 9142.5
  Top Layer w7.87: U5.G14@10007.87,3700.79 v5@10027.56,3720.47
  MidLayer3 w5: v2@2462.6,3094.49 2622.05,3253.94 2622.05,3460.63 2685.04,3523.62 3287.4,3523.62 3377.95,3614.17 4503.94,3614.17 4894.61,4004.85 9214.23,4004.85 9354.19,4144.8 9563.94,4144.8 9619.59,4200.45 10198.7,4200.45 10204,4195.15 10204,4037.28 10200.72,4034 10059.32,4034 9994.68,3969.36 9994.68,3866.45 10007.6,3853.53 10007.6,3744.37 v5(10031.5,3720.47)
  Bottom Layer w11.81: R234.1@2418.43,3094.49 R238.1@2550.87,3094.49
  other v2: 2460.63,3094.49
PBCTRLC.JTAG.SOFT.TDO: R235.1 R239.1 U5.G13 | length 8635.2
  Top Layer w7.87: v5@9948.82,3720.47 U5.G13@9968.5,3700.79
  MidLayer3 w5: v2(2460.63,3015.75) 2633.86,3188.98 2633.86,3452.76 2692.91,3511.81 3291.34,3511.81 3381.89,3602.36 4740.16,3602.36 4775.59,3637.8 4775.59,3763.78 5005.52,3993.71 9217.24,3993.71 9358.33,4134.8 9475.13,4134.8 9510.3,4099.63 9510.3,4034.83 9613.55,3931.58 9883.39,3931.58 9929.13,3885.83 9929.13,3740.16 v5@9948.82,3720.47
  Bottom Layer w11.81: R235.1@2418.43,3015.75 R239.1@2550.87,3015.75
  other v5: 9944.88,3720.47
PBCTRLC.JTAG.SOFT.TMS: R236.1 R240.1 U5.G11 | length 8729.5
  Top Layer w7.87: v1(9870.08,3720.47) U5.G11@9889.76,3700.79
  MidLayer3 w5: v2(2460.63,2858.27) 2657.48,3055.12 2657.48,3444.88 2700.79,3488.19 3299.21,3488.19 3391.57,3580.55 4527.88,3580.55 4573,3535.43 4732.28,3535.43 4799.21,3602.36 4799.21,3748.03 5022.62,3971.44 9223.25,3971.44 9366.61,4114.8 9466.84,4114.8 9490.3,4091.34 9490.3,4026.54 9605.27,3911.58 9828.58,3911.58 9850.39,3889.76 9850.39,3736.22 v1(9870.08,3720.47)
  Bottom Layer w11.81: R236.1@2418.43,2858.27 R240.1@2548.9,2858.27
PBCTRLC.SPARE1: EXTHDR3.39 U5.C19 | length 9647.6
  Top Layer w7.87: U5.C19@10204.72,3858.27 v1(10224.41,3877.95)
  Top Layer w8: EXTHDR3.39@3527.56,3409.45 3527.56,3479.58 3483.68,3523.45 2893.87,3523.45 2870.08,3547.24 2870.08,3759.84 2901.57,3791.34 3259.84,3791.34 3811.96,4343.45 7088.68,4343.45 v2(7188.68,4243.45)
  MidLayer1 w5: v2(7188.68,4243.45) 7188.68,4509.68 7382.45,4703.45 9948.68,4703.45 10075.74,4576.39 10075.74,4274.39 10228.68,4121.45 10228.68,3964.45 10224.41,3960.18 v1(10224.41,3877.95)
PBCTRLC.SPARE2: EXTHDR3.41 U5.D19 | length 9683.7
  Top Layer w7.87: U5.D19@10204.72,3818.9 v1(10224.41,3838.58)
  Top Layer w8: EXTHDR3.41@3559.06,3409.45 3559.06,3474.16 3557.97,3474.16 3493.68,3538.45 2902.49,3538.45 2885.83,3555.12 2885.83,3748.03 2913.39,3775.59 3271.65,3775.59 3814.52,4318.45 7073.68,4318.45 v2(7148.68,4243.45)
  MidLayer1 w5: v2(7148.68,4243.45) 7148.68,4495.68 7373.45,4720.45 9954.68,4720.45 10087.68,4587.45 10087.68,4286.45 10244.09,4130.04 10244.09,3858.27 v1(10224.41,3838.58)
PBCTRLC.SPARE3: EXTHDR3.43 U5.B23 | length 9427.9
  Top Layer w5: v2(8707.38,4798.45) 8733.55,4772.28 9669.85,4772.28 10353.68,4088.45 10353.68,4043.45 10388.68,4008.45 10388.68,3963.48 10383.08,3957.89 10383.08,3918.52 U5.B23@10362.2,3897.64
  Top Layer w8: EXTHDR3.43@3590.55,3409.45 3590.55,3476.58 3513.68,3553.45 2911.11,3553.45 2901.57,3562.99 2901.57,3740.16 2921.26,3759.84 3279.53,3759.84 3818.14,4298.45 6373.68,4298.45 v2(6428.68,4243.45)
  MidLayer4 w5: v2(6428.68,4243.45) 6549.45,4243.45 7079.45,4773.45 8173.68,4773.45 8213.68,4813.45 8692.38,4813.45 v2(8707.38,4798.45)
PBCTRLC.SPARE4: EXTHDR3.65 U5.E2 | length 6001.4
  Top Layer w5: EXTHDR3.65@3937.01,3409.45 3937.01,3476.78 4008.68,3548.45 4518.68,3548.45 4563.68,3593.45 4778.68,3593.45 4798.68,3613.45 4988.68,3613.45 v2(5048.68,3673.45) ; v2(5908.68,3683.45) 6223.68,3998.45 8558.68,3998.45 8708.68,3848.45 9273.68,3848.45 9308.68,3813.45 9408.68,3813.45 9422.94,3799.2 9515.76,3799.2 U5.E2@9535.43,3779.53
  MidLayer3 w5: v2(5048.68,3673.45) 5669,3673.45 5713.89,3718.35 5873.79,3718.35 v2(5908.68,3683.45)
PBCTRLC.SPI_CS_N0: EXTHDR3.59 U5.P3 | length 6682.6
  Top Layer w5: v1(3842.52,3330.71) 3889.76,3283.47 4511.81,3283.47 v1(4547.24,3318.9)
  Top Layer w7.87: v1(3842.52,3330.71) EXTHDR3.59@3842.52,3409.45 ; v1(9555.12,3405.51) U5.P3@9574.8,3425.2
  MidLayer1 w5: v2(4700.79,2905.51) 4834.65,2905.51 4976.38,3047.24 4976.38,3283.47 5059.06,3366.14 6181.1,3366.14 6216.54,3330.71 6295.28,3330.71 6468.5,3503.94 7988.19,3503.94 8043.31,3448.82 8087.57,3448.82 8130.88,3492.13 8192.35,3492.13 8208.68,3508.45 8248.68,3508.45 8265.01,3492.13 9089.83,3492.13 9176.44,3405.51 9413.39,3405.51 9433.07,3405.51 v1(9555.12,3405.51)
  MidLayer3 w5: v1(4547.24,3318.9) 4547.24,3279.53 4641.73,3185.04 4641.73,2964.57 v2(4700.79,2905.51)
PBCTRLC.SPI_CS_N1: EXTHDR3.63 U5.P1 | length 6797.9
  Top Layer w5: EXTHDR3.63@3905.51,3409.45 3905.51,3326.77 3925.2,3307.09 4460.63,3307.09 v1(4484.25,3330.71) ; v5(6259.84,3374.02) 6295.28,3374.02 6314.96,3354.33 6314.96,3283.47 6465.97,3132.45 8230.68,3132.45 8726.68,3628.45 9096.97,3628.45 9124.63,3600.79 9225.64,3600.79 9401.23,3425.2 U5.P1@9496.06,3425.2
  MidLayer1 w5: v2(4614.17,2921.26) 4633.86,2940.95 4838.58,2940.95 4952.76,3055.12 4952.76,3291.34 5051.18,3389.76 6188.98,3389.76 6204.72,3374.02 v5(6259.84,3374.02)
  MidLayer3 w5: v1(4484.25,3330.71) 4484.25,3307.09 4618.11,3173.23 4618.11,2952.76 4614.17,2948.82 v2(4614.17,2921.26)
PBPOWER.1V2PBA: EXTHDR1.73 EXTHDR1.75 R164.2 U31.5 | length 922.9
  Top Layer w19.68: EXTHDR1.75@826.77,3086.61 v2(826.77,3007.87) ; EXTHDR1.73@858.27,3086.61 v2(858.27,3007.87) ; v2@826.77,2996.06 v2(826.77,3007.87) ; v2@826.77,2996.06 v2(842.52,2980.32) v2@858.27,2996.06 ; v2@826.77,2996.06 842.52,2996.06 v2@858.27,2996.06 ; v2(826.77,3007.87) v2(858.27,3007.87) ; v2@858.27,2996.06 v2(858.27,3007.87)
  Bottom Layer w7.87: R164.2@921.26,3094.49 874.02,3141.73 874.02,3322.83 893.7,3342.52 956.69,3342.52 1016.11,3401.94 U31.5@1033.46,3401.94
  Bottom Layer w29.53: v2(826.77,3007.87) 842.52,3007.87 ; v2(842.52,2980.32) 842.52,3007.87 ; R164.2@925.2,3094.49 925.2,3039.37 893.7,3007.87 v2(858.27,3007.87) 842.52,3007.87
PBPOWER.1V2PBB: EXTHDR2.73 EXTHDR2.75 R162.2 U29.5 | length 2486.4
  Top Layer w19.68: EXTHDR2.75@3307.09,3086.61 v2(3307.09,3161.42) ; EXTHDR2.73@3338.58,3078.74 EXTHDR2.73@3338.58,3086.61 v2(3338.58,3161.42) ; v2(3307.09,3161.42) 3307.09,3169.29 v2(3322.83,3185.04) 3338.58,3169.29 v2(3338.58,3161.42) ; v2(3307.09,3161.42) v2(3338.58,3161.42)
  Bottom Layer w7.87: R162.2@2429.13,3602.36 2428.15,3603.35 2381.89,3649.61 2381.89,3980.32 2629.92,4228.35 2881.89,4228.35 2933.07,4279.53 U29.5@2933.07,4307.45
  Bottom Layer w29.53: R162.2@2431.1,3606.3 2431.1,3524 2503.1,3452 2732,3452 2763,3421 2763,3395 2822,3336 3183.69,3336 3322.83,3196.85 v2(3322.83,3185.04)
PBPOWER.1V2PBC: EXTHDR3.73 EXTHDR3.75 R163.2 U30.5 | length 3063.8
  Top Layer w19.68: v2(4059.06,3330.71) v2(4086.61,3330.71) v2(4114.17,3330.71) 4100.39,3344.49 4094.49,3350.39 ; v2@4062.99,3330.71 v2@4062.99,3342.52 ; EXTHDR3.73@4062.99,3409.45 v2@4062.99,3342.52 ; v2@4094.49,3330.71 4094.49,3342.52 ; EXTHDR3.75@4094.49,3409.45 4094.49,3350.39 ; v2@4062.99,3342.52 4086.61,3342.52 4094.49,3342.52 ; 4094.49,3342.52 4094.49,3350.39
  Bottom Layer w7.87: R163.2@2637.8,3818.9 2598.43,3858.27 2598.43,4082.68 2681.1,4165.35 3114.17,4165.35 3228.35,4279.53 U30.5@3228.35,4307.45
  Bottom Layer w29.53: R163.2@2647.64,3812.99 2647.64,3631.89 2751.97,3527.56 3196.85,3527.56 3358.27,3366.14 3862.2,3366.14 3897.64,3330.71 v2(4059.06,3330.71) v2(4086.61,3330.71) v2(4114.17,3330.71)
PBPOWER.1V8PBA: EXTHDR1.77 EXTHDR1.79 R167.2 U34.5 | length 878
  Top Layer w19.68: EXTHDR1.79@763.78,3086.61 763.78,3007.87 ; EXTHDR1.77@795.28,3086.61 795.28,3007.87 ; v2@763.78,2992.13 v2(763.78,2980.32) v2(795.28,2980.32) v2@795.28,2992.13 ; v2@763.78,2992.13 763.78,3007.87 ; v2@763.78,2992.13 779.53,2992.13 v2@795.28,2992.13 ; 763.78,3007.87 v2(779.53,3007.87) 795.28,3007.87 ; v2@795.28,2992.13 795.28,3007.87
  Bottom Layer w7.87: R167.2@826.77,3090.55 824.8,3092.52 775.59,3141.73 775.59,3338.58 799.21,3362.2 822.83,3362.2 862.57,3401.94 U34.5@885.83,3401.94
  Bottom Layer w29.53: v2(763.78,2980.32) 779.53,2980.32 ; v2(795.28,2980.32) 779.53,2980.32 ; R167.2@826.77,3094.49 826.77,3090.55 826.77,3078.74 779.53,3031.5 v2(779.53,3007.87) 779.53,2980.32
PBPOWER.1V8PBB: EXTHDR2.77 EXTHDR2.79 R165.2 U32.5 | length 2449.8
  Top Layer w19.68: EXTHDR2.79@3244.09,3086.61 3244.09,3161.42 3244.09,3169.29 ; EXTHDR2.77@3275.59,3086.61 3275.59,3161.42 3275.59,3169.29 ; 3244.09,3169.29 v2(3244.09,3185.04) 3259.84,3185.04 v2(3275.59,3185.04) 3275.59,3169.29 ; 3244.09,3169.29 3259.84,3169.29 3275.59,3169.29
  Bottom Layer w7.87: R165.2@2332.68,3602.36 2330.71,3604.33 2283.46,3651.57 2283.46,3925.2 2618.11,4259.84 2763.78,4259.84 2785.43,4281.5 U32.5@2785.43,4307.45
  Bottom Layer w29.53: v2(3259.84,3161.42) 3259.84,3185.04 3259.84,3200.79 3196.85,3263.78 2829.22,3263.78 2723,3370 2513,3370 2332.68,3550.32 R165.2@2332.68,3602.36 ; R165.2@2332.68,3602.36 R165.2@2332.68,3606.3 R165.2@2332.68,3602.36
PBPOWER.1V8PBC: EXTHDR3.77 EXTHDR3.79 R166.2 U33.5 | length 3003.9
  Top Layer w19.68: EXTHDR3.77@4125.98,3409.45 4125.98,3476.38 ; EXTHDR3.79@4157.48,3409.45 4157.48,3476.38 ; 4125.98,3476.38 v2(4114.17,3488.19) v2(4141.73,3488.19) ; 4125.98,3476.38 4125.98,3488.19 v2(4141.73,3488.19) ; 4125.98,3476.38 4141.73,3476.38 4157.48,3476.38 ; v2(4141.73,3488.19) 4157.48,3488.19 4157.48,3476.38 ; v2(4141.73,3488.19) v2(4169.29,3488.19) 4157.48,3476.38
  Bottom Layer w7.87: R166.2@2838.58,3814.96 2795.28,3858.27 2795.28,4062.99 2834.65,4102.36 3346.46,4102.36 3523.62,4279.53 U33.5@3523.62,4307.45
  Bottom Layer w29.53: R166.2@2844.49,3812.99 2844.49,3698.82 2933.07,3610.24 4032.76,3610.24 4058,3585 4058,3488.19 v2(4114.17,3488.19) v2(4141.73,3488.19) v2(4169.29,3488.19)
PBPOWER.2V5PBA: EXTHDR1.81 EXTHDR1.83 R170.2 U37.5 | length 773.2
  Top Layer w19.68: EXTHDR1.83@700.79,3086.61 v2(700.79,3007.87) ; EXTHDR1.81@732.28,3086.61 v2(732.28,3007.87) ; v2(700.79,3007.87) 700.79,2996.06 v2(716.54,2980.32) ; v2(700.79,3007.87) 716.54,3007.87 ; v2(716.54,2980.32) 732.28,2996.06 v2(732.28,3007.87) ; v2(716.54,2980.32) 716.54,3007.87 ; 716.54,3007.87 v2(732.28,3007.87)
  Bottom Layer w7.87: R170.2@728.35,3090.55 726.38,3092.52 677.17,3141.73 677.17,3330.71 708.66,3362.2 728.35,3362.2 738.19,3372.05 U37.5@738.19,3401.94
  Bottom Layer w29.53: v2(716.54,2980.32) 716.54,3007.87 716.54,3031.5 728.35,3043.31 728.35,3090.55 R170.2@728.35,3094.49
PBPOWER.2V5PBB: EXTHDR2.81 EXTHDR2.83 R168.2 U35.5 | length 2348.7
  Top Layer w19.68: EXTHDR2.83@3181.1,3086.61 v2(3181.1,3161.42) ; EXTHDR2.81@3212.6,3086.61 v2(3212.6,3161.42) ; v2(3181.1,3161.42) 3181.1,3169.29 v2(3196.85,3185.04) 3212.6,3169.29 v2(3212.6,3161.42) ; v2(3181.1,3161.42) v2(3212.6,3161.42)
  Bottom Layer w7.87: R168.2@2236.22,3602.36 2233.27,3605.32 2185.04,3653.54 2185.04,3889.76 2204.72,3909.45 2220.47,3909.45 2618.47,4307.45 U35.5@2637.8,4307.45
  Bottom Layer w29.53: R168.2@2234.25,3606.3 2254,3586.55 2254,3545 2506,3293 2751.17,3293 2819.76,3224.41 3177.17,3224.41 3196.85,3204.72 v2(3196.85,3185.04)
PBPOWER.2V5PBC: EXTHDR3.81 EXTHDR3.83 R169.2 U36.5 | length 3151.9
  Top Layer w19.68: v2@4188.98,3330.71 4188.98,3342.52 ; EXTHDR3.81@4188.98,3409.45 4188.98,3342.52 ; v2@4220.47,3330.71 4220.47,3342.52 ; EXTHDR3.83@4220.47,3409.45 4220.47,3342.52 ; 4188.98,3342.52 v2(4177.17,3330.71) v2(4204.72,3330.71) v2(4232.28,3330.71) 4220.47,3342.52 ; 4188.98,3342.52 4204.72,3342.52 4220.47,3342.52
  Bottom Layer w7.87: R169.2@2740.16,3814.96 2696.85,3858.27 2696.85,4062.99 2767.72,4133.86 3228.35,4133.86 3375.98,4281.5 U36.5@3375.98,4307.45
  Bottom Layer w29.53: R169.2@2746.06,3812.99 2746.06,3596.46 2775.59,3566.93 3216.54,3566.93 3377.95,3405.51 3885.83,3405.51 3917.32,3374.02 4133.86,3374.02 v2(4177.17,3330.71) v2(4204.72,3330.71) v2(4232.28,3330.71)
PBPOWER.3V3PBA: EXTHDR1.85 EXTHDR1.87 R173.2 U40.5 | length 768.5
  Top Layer w19.68: EXTHDR1.87@637.79,3086.61 637.79,3007.87 637.79,3000 ; EXTHDR1.85@669.29,3086.61 669.29,3007.87 669.29,3000 ; 637.79,3000 v2(637.8,2980.32) v2(669.29,2980.32) 669.29,3000 ; 637.8,3000 653.54,3000 669.29,3000
  Bottom Layer w7.87: U40.5@590.55,3401.94 590.55,3370.08 578.74,3358.27 578.74,3141.73 627.95,3092.52 R173.2@629.92,3090.55
  Bottom Layer w29.53: R173.2@629.92,3094.49 629.92,3090.55 629.92,3047.24 653.54,3023.62 v2(653.54,3007.87) 653.54,2980.32 ; v2(637.8,2980.32) 653.54,2980.32 ; v2(669.29,2980.32) 653.54,2980.32
PBPOWER.3V3PBB: EXTHDR2.85 EXTHDR2.87 R171.2 U38.5 | length 2934
  Top Layer w19.68: EXTHDR2.87@3118.11,3086.61 3118.11,3161.42 v2@3118.11,3173.23 ; EXTHDR2.85@3149.61,3086.61 3149.61,3161.42 v2@3149.61,3173.23 ; v2@3118.11,3173.23 v2(3118.11,3185.04) 3133.86,3185.04 v2(3149.61,3185.04) v2@3149.61,3173.23 ; v2@3118.11,3173.23 3133.86,3173.23 v2@3149.61,3173.23
  Bottom Layer w7.87: R171.2@2031.5,3606.3 1980.32,3657.48 1980.32,3854.33 2098.43,3972.44 2188.98,3972.44 2342.52,4125.98 U38.5@2342.52,4307.45
  Bottom Layer w29.53: R171.2@2047.24,3606.3 2047.24,3192.91 2070.87,3169.29 2181.1,3169.29 2291.34,3059.06 2787.4,3059.06 2854.33,2992.13 2984.25,2992.13 3133.86,3141.73 v2(3133.86,3161.42) v2@3133.86,3169.29 ; v2@3133.86,3169.29 v2(3149.61,3185.04) 3133.86,3185.04 v2(3118.11,3185.04) v2@3133.86,3169.29
PBPOWER.3V3PBC: EXTHDR3.85 EXTHDR3.87 R172.2 U39.5 | length 3090.1
  Top Layer w19.68: 4251.97,3472.44 4250,3474.41 v2(4236.22,3488.19) v2(4263.78,3488.19) v2@4283.46,3488.19 ; EXTHDR3.85@4251.97,3409.45 4251.97,3476.38 ; v2@4251.97,3488.19 4251.97,3476.38 ; EXTHDR3.87@4283.47,3409.45 4283.47,3476.38 ; v2(4291.34,3488.19) v2@4283.46,3488.19 ; 4251.97,3476.38 4263.78,3476.38 4283.47,3476.38 ; 4283.47,3476.38 v2@4283.47,3488.19
  Bottom Layer w7.87: R172.2@2940.94,3811.02 2893.7,3858.27 2893.7,4047.24 2917.32,4070.87 3460.63,4070.87 3671.26,4281.5 U39.5@3671.26,4307.45
  Bottom Layer w29.53: R172.2@2942.91,3797.24 2893.7,3748.03 2893.7,3712.6 2948.82,3657.48 4189.52,3657.48 4236.22,3610.78 v2(4236.22,3488.19) v2(4263.78,3488.19) v2(4291.34,3488.19)
PBPOWER.5V0PBA: EXTHDR1.89 EXTHDR1.91 EXTHDR1.93 R176.2 U43.5 | length 1056.4
  Top Layer w19.68: v2(543.31,3007.87) EXTHDR1.93@543.31,3086.61 ; v2(574.8,3007.87) EXTHDR1.91@574.8,3086.61 ; v2(606.3,3007.87) EXTHDR1.89@606.3,3086.61
  Top Layer w25: v2(543.31,3007.87) v2(574.8,3007.87) v2(606.3,3007.87)
  Bottom Layer w7.87: U43.5@148.61,3400.9 148.61,3242.39 241.39,3149.61 476.38,3149.61 R176.2@531.5,3094.49
  Bottom Layer w29.53: R176.2@531.5,3094.49 531.5,3051.18 543.31,3039.37 v2(543.31,3007.87) v2(574.8,3007.87) v2(606.3,3007.87)
PBPOWER.5V0PBB: EXTHDR2.89 EXTHDR2.91 EXTHDR2.93 R174.2 U41.5 | length 2479.6
  Top Layer w19.68: EXTHDR2.93@3023.62,3086.61 v2(3023.62,3161.42) v2(3055.12,3161.42) ; EXTHDR2.91@3055.12,3086.61 v2(3055.12,3161.42) ; EXTHDR2.89@3086.61,3086.61 v2(3086.61,3161.42) v2(3055.12,3161.42)
  Bottom Layer w7.87: R174.2@2133.86,3604.33 2086.61,3651.57 2086.61,3913.39 2114.17,3940.94 2204.72,3940.94 2490.16,4226.38 U41.5@2490.16,4307.45
  Bottom Layer w29.53: R174.2@2135.83,3606.3 2308,3434.13 2308,3239 2334,3213 2759.44,3213 2799.21,3173.23 2921.26,3173.23 2933.07,3161.42 v2(3023.62,3161.42) v2(3055.12,3161.42) v2(3086.61,3161.42)
PBPOWER.5V0PBC: EXTHDR3.89 EXTHDR3.91 EXTHDR3.93 R175.2 U42.5 | length 3476.6
  Top Layer w19.68: v2@4314.96,3330.71 EXTHDR3.89@4314.96,3409.45 ; 4346.46,3330.71 EXTHDR3.91@4346.46,3409.45 ; 4377.95,3330.71 EXTHDR3.93@4377.95,3409.45
  Top Layer w29.53: v2(4267.72,3330.71) v2(4295.28,3330.71) 4314.96,3330.71 v2(4322.83,3330.71) 4377.95,3330.71
  Bottom Layer w7.87: R175.2@2547.24,3811.02 2496.06,3862.2 2496.06,4043.31 2649.61,4196.85 3000,4196.85 3080.71,4277.56 U42.5@3080.71,4307.45
  Bottom Layer w29.53: R175.2@2549.21,3812.99 2549.21,3671.26 2732.28,3488.19 3177.17,3488.19 3409.45,3255.91 4259.84,3255.91 4295.28,3291.34 v2(4295.28,3330.71) ; v2@4271.65,3330.71 v2(4295.28,3330.71) ; v2(4322.83,3330.71) v2(4295.28,3330.71)
PBSPI.DIN: EXTHDR1.55 EXTHDR2.55 EXTHDR3.55 U5.N5 | length 10120
  Top Layer w5: EXTHDR1.55@1141.73,3086.61 1141.73,3153.54 1185.19,3197 1212.45,3197 1220.47,3188.98 v1(1255.91,3188.98)
  Top Layer w7.87: v1(3622.05,3007.87) EXTHDR2.55@3622.05,3086.61 ; v1(3779.53,3330.71) EXTHDR3.55@3779.53,3409.45 ; v1(9633.86,3484.25) U5.N5@9653.54,3464.57
  MidLayer1 w5: v1(1255.91,3188.98) 1295.28,3188.98 1318.9,3165.36 1318.9,3149.61 1503.94,2964.57 2097.8,2964.57 2267.09,3133.86 2767.72,3133.86 2814.96,3181.1 2909.45,3181.1 3000,3090.55 3511.81,3090.55 3568.3,3034.07 3568.3,2998.63 3582.68,2984.25 3598.43,2984.25 v1(3622.05,3007.87) 3622.05,3102.36 3728.35,3208.66 3728.35,3346.46 3740.16,3358.27 3767.72,3358.27 3779.53,3346.46 v1(3779.53,3330.71)
  MidLayer2 w5: v1(3622.05,3007.87) 3665.35,2964.57 3796,2964.57 3909.86,3078.43 4400.28,3078.43 4466.9,3011.81 4854.33,3011.81 4940.95,3098.43 4940.95,3141.73 5220.47,3421.26 6031.5,3421.26 6366.14,3086.61 8355.05,3086.61 8607.02,3338.58 9094.49,3338.58 9220.47,3464.57 9413.39,3464.57 9433.07,3464.57 9614.17,3464.57 v1(9633.86,3484.25)
PBSPI.DOUT: EXTHDR1.53 EXTHDR2.53 EXTHDR3.53 U5.M8 | length 10091.8
  Top Layer w5: EXTHDR1.53@1173.23,3086.61 1173.23,3153.54 1177.16,3157.48 1216.54,3157.48 1224.41,3165.36 v1(1283.46,3165.36)
  Top Layer w7.87: v1(3653.54,3007.87) EXTHDR2.53@3653.54,3086.61 ; v1(3748.03,3330.71) EXTHDR3.53@3748.03,3409.45 ; v1(9751.97,3523.62) U5.M8@9771.65,3503.94
  MidLayer1 w5: v1(1283.46,3165.36) 1496.06,2952.76 2107.72,2952.76 2277.01,3122.05 2775.59,3122.05 2822.83,3169.29 2901.58,3169.29 2992.13,3078.74 3503.94,3078.74 3555.12,3027.56 3555.12,2992.13 3578.74,2968.5 3614.18,2968.5 v1(3653.54,3007.87) 3653.54,3118.11 3748.03,3212.6 v1(3748.03,3330.71)
  MidLayer2 w5: v1(3653.54,3007.87) 3685.04,2976.38 3793.67,2976.38 3905.72,3088.43 4404.43,3088.43 4469.23,3023.62 4846.46,3023.62 4929.13,3106.3 4929.13,3149.61 5212.6,3433.07 6035.43,3433.07 6370.08,3098.43 8350.16,3098.43 8602.13,3350.39 9090.55,3350.39 9244.1,3503.94 9732.28,3503.94 v1(9751.97,3523.62)
PBSPI.SCLK: EXTHDR1.57 EXTHDR2.57 EXTHDR3.57 U5.P5 | length 10196.3
  Top Layer w5: EXTHDR1.57@1110.24,3086.61 1110.24,3141.24 1179,3210 v1(1230,3210)
  Top Layer w7.87: v1(3590.55,3007.87) EXTHDR2.57@3590.55,3086.61 ; v1(3811.02,3330.71) EXTHDR3.57@3811.02,3409.45 ; v1(9633.86,3405.51) U5.P5@9653.54,3425.2
  MidLayer1 w5: v1(1230,3210) 1293.94,3210 1330.71,3173.23 1330.71,3157.48 1511.81,2976.38 2089.61,2976.38 2258.9,3145.67 2759.84,3145.67 2807.09,3192.91 2917.32,3192.91 3007.87,3102.36 3519.69,3102.36 3590.55,3031.5 v1(3590.55,3007.87) 3606.3,3023.62 3606.3,3102.36 3716.54,3212.6 3716.54,3358.27 3728.35,3370.08 3791.34,3370.08 3811.02,3350.39 v1(3811.02,3330.71)
  MidLayer2 w5: v1(3590.55,3007.87) 3645.67,2952.76 3798.33,2952.76 3914,3068.43 4396.14,3068.43 4464.57,3000 4866.14,3000 4952.76,3086.61 4952.76,3133.86 5228.35,3409.45 6027.56,3409.45 6362.2,3074.8 8359.95,3074.8 8611.92,3326.77 9098.43,3326.77 9196.85,3425.2 9413.39,3425.2 9433.07,3425.2 9614.17,3425.2 v1(9633.86,3405.51)
PDA.D0: HDR_B1.42 U5.R8 | length 4529.5
  Top Layer w5: v1(7118.11,1456.69) HDR_B1.42@7118.11,1531.5
  Top Layer w7.87: v1(9751.97,3366.14) U5.R8@9771.65,3385.83
  MidLayer2 w5: v9(9149.5,3247.9) 9149.5,3312.5 9222.83,3385.83 9460.63,3385.83 ; 9433.07,3385.83 9732.28,3385.83 v1(9751.97,3366.14)
  MidLayer4 w5: v1(7118.11,1456.69) 7118.11,1591.11 7132,1605 7728,1605 8001,1878 8661,1878 8771,1988 8771,2663 8675,2759 8675,2944 8734,3003 8898.9,3003 8913.6,3017.7 8913.6,3241.7 8937.49,3265.59 9131.81,3265.59 v9(9149.5,3247.9)
PDA.D1: HDR_B1.44 U5.E7 | length 5834.7
  Top Layer w5: v1(7149.61,1456.69) HDR_B1.44@7149.61,1531.5
  Top Layer w7.87: v1(9712.6,3799.21) U5.E7@9732.28,3779.53
  MidLayer2 w5: v8(9327,4358) 9354,4385 9412.4,4385 9452.4,4345 9555.35,4345 9693,4207.35 9693,3818.81 v1(9712.6,3799.21)
  MidLayer4 w5: v1(7149.61,1456.69) 7149.61,1573.61 7171,1595 7732.14,1595 8005.14,1868 8665.14,1868 8781,1983.86 8781,2667.14 8685,2763.14 8685,2939.86 8738.14,2993 8854,2993 v9(8867,2980)
  Bottom Layer w5: v9(8867,2980) 8885.86,2980 8892.86,2987 9169.52,2987 9191.3,3008.78 9191.3,4162.58 9327,4298.28 v8(9327,4358)
PDA.D2: HDR_B1.46 U5.E6 | length 5732.9
  Top Layer w5: v1(7181.1,1456.69) HDR_B1.46@7181.1,1531.5
  Top Layer w7.87: v1(9673.23,3799.21) U5.E6@9692.91,3779.53
  MidLayer2 w5: v8(9365.5,4347.2) 9382.8,4347.2 9405,4325 9547.07,4325 9653.46,4218.61 9653.46,3828.7 9673.23,3808.93 v1(9673.23,3799.21)
  MidLayer4 w5: v1(7181.1,1456.69) 7181.1,1563 7203.1,1585 7736.28,1585 8009.28,1858 8669.28,1858 8791,1979.72 8791,2671.28 8695,2767.28 8695,2935.72 8742.28,2983 8812,2983 v9(8850,2945)
  Bottom Layer w5: v9(8850,2945) 8865,2945 8897,2977 9173.66,2977 9201.3,3004.64 9201.3,4158.44 9347,4304.14 9347,4328.7 v8(9365.5,4347.2)
PDA.D3: HDR_B1.48 U5.C6 | length 5657.4
  Top Layer w5: v1(7212.6,1456.69) HDR_B1.48@7212.6,1531.5
  Top Layer w7.87: v1(9673.23,3877.95) U5.C6@9692.91,3858.27
  MidLayer2 w5: v8(9405,4358) 9428,4335 9551.21,4335 9673.23,4212.98 v1(9673.23,3877.95)
  MidLayer4 w5: v1(7212.6,1456.69) 7212.6,1557 7230.6,1575 7740.43,1575 8013.43,1848 8673.43,1848 8801,1975.57 8801,2675.43 8705,2771.43 8705,2931.57 8733.43,2960 v9(8778,2960)
  Bottom Layer w5: v9(8778,2960) 8811.7,2960 8855.2,3003.5 8877.1,3003.5 8883.6,2997 9165.37,2997 9181.3,3012.93 9181.3,4166.73 9297.5,4282.93 9297.5,4358.5 9317.8,4378.8 9384.2,4378.8 v8(9405,4358)
PDA.D4: HDR_B1.50 U5.H11 | length 5948.5
  Top Layer w5: v1(7244.09,1456.69) HDR_B1.50@7244.09,1531.5
  Top Layer w7.87: v1(9870.08,3681.1) U5.H11@9889.76,3661.42
  MidLayer2 w5: v8(9372,4315) 9542.93,4315 9643.46,4214.47 9643.46,3972.46 9614,3943 9614,3825 9620.3,3818.7 9644.2,3818.7 9653.8,3809.1 9653.8,3784.2 9658.47,3779.53 9842.47,3779.53 9850.39,3771.61 9850.39,3700.79 v1(9870.08,3681.1)
  MidLayer4 w5: v1(7244.09,1456.69) 7244.09,1545 7264.09,1565 7744.57,1565 8017.57,1838 8677.57,1838 8811,1971.43 8811,2679.57 8715,2775.57 8715,2927.43 8725.97,2938.4 8822.5,2938.4 8837.5,2923.4 8877.4,2923.4 v9(8894,2940)
  Bottom Layer w5: v9(8894,2940) 8894,2959.86 8901.14,2967 9177.8,2967 9211.3,3000.5 9211.3,4154.3 v8(9372,4315)
PPRT#.ACK: HDR6.10 R24.1 | length 260.2
  Bottom Layer w5: R24.1@1011.81,5781.02 1011.81,5840.55 1063.78,5892.52 HDR6.10@1063.78,6019.69
PPRT#.AUTOFD: HDR6.14 R35.2 | length 591.6
  Bottom Layer w5: HDR6.14@1963.78,6119.69 2030.37,6053.1 2030.37,5967.24 2153.94,5843.67 2175.73,5843.67 2224,5795.4 2224,5773.1 2211.6,5760.7 2134.5,5760.7 R35.2@2114.17,5781.02
  Bottom Layer w7.87: R35.2@2114.17,5779.92 R35.2@2114.17,5781.02
PPRT#.BUSY: HDR6.11 R23.1 | length 251.4
  Bottom Layer w5: R23.1@933.07,5781.02 933.07,5840.55 963.78,5871.26 HDR6.11@963.78,6019.69
PPRT#.D0: HDR6.2 R32.2 | length 314.8
  Bottom Layer w5: HDR6.2@1863.78,6019.69 1863.78,5978.74 2035.43,5807.09 R32.2@2035.43,5781.02
  Bottom Layer w7.87: R32.2@2035.43,5775.99 R32.2@2035.43,5781.02
PPRT#.D1: HDR6.3 R31.2 | length 253.3
  Bottom Layer w5: HDR6.3@1763.78,6019.69 1763.78,5875.98 1799.21,5840.55 R31.2@1799.21,5781.02
PPRT#.D2: HDR6.4 R30.2 | length 247.8
  Bottom Layer w7.87: R30.2@1641.73,5781.02 1641.73,5840.55 1663.78,5862.6 HDR6.4@1663.78,6019.69
PPRT#.D3: HDR6.5 R29.2 | length 304.2
  Bottom Layer w5: R29.2@1405.51,5781.02 1405.51,5861.42 HDR6.5@1563.78,6019.69